# Altium PCB Brake_kit_PCB.PcbDoc
Units mil, origin at the board's own origin, x right, y up, seen from the top; angles counter-clockwise.
Board outline 1574.8 x 2755.91 mil, 2 copper layers (Top Layer, Bottom Layer), stack 57 mil thick; 22 components, 7 nets, 31 pads, 0 vias.
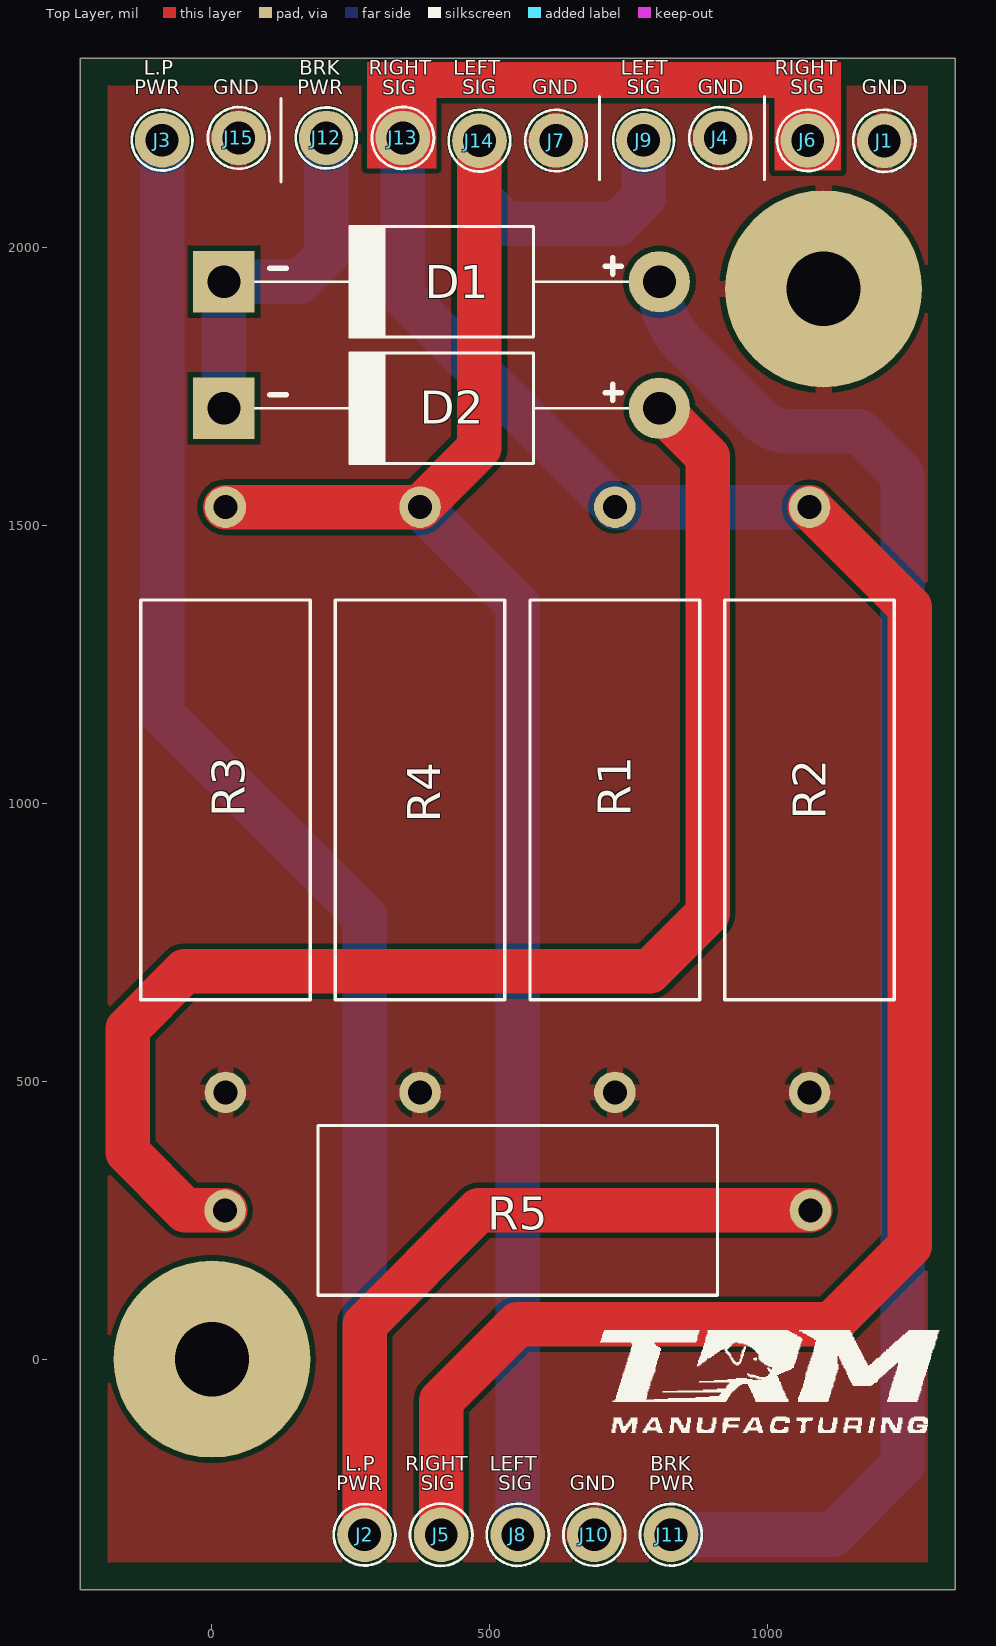
[diagram p0: Top Layer view]
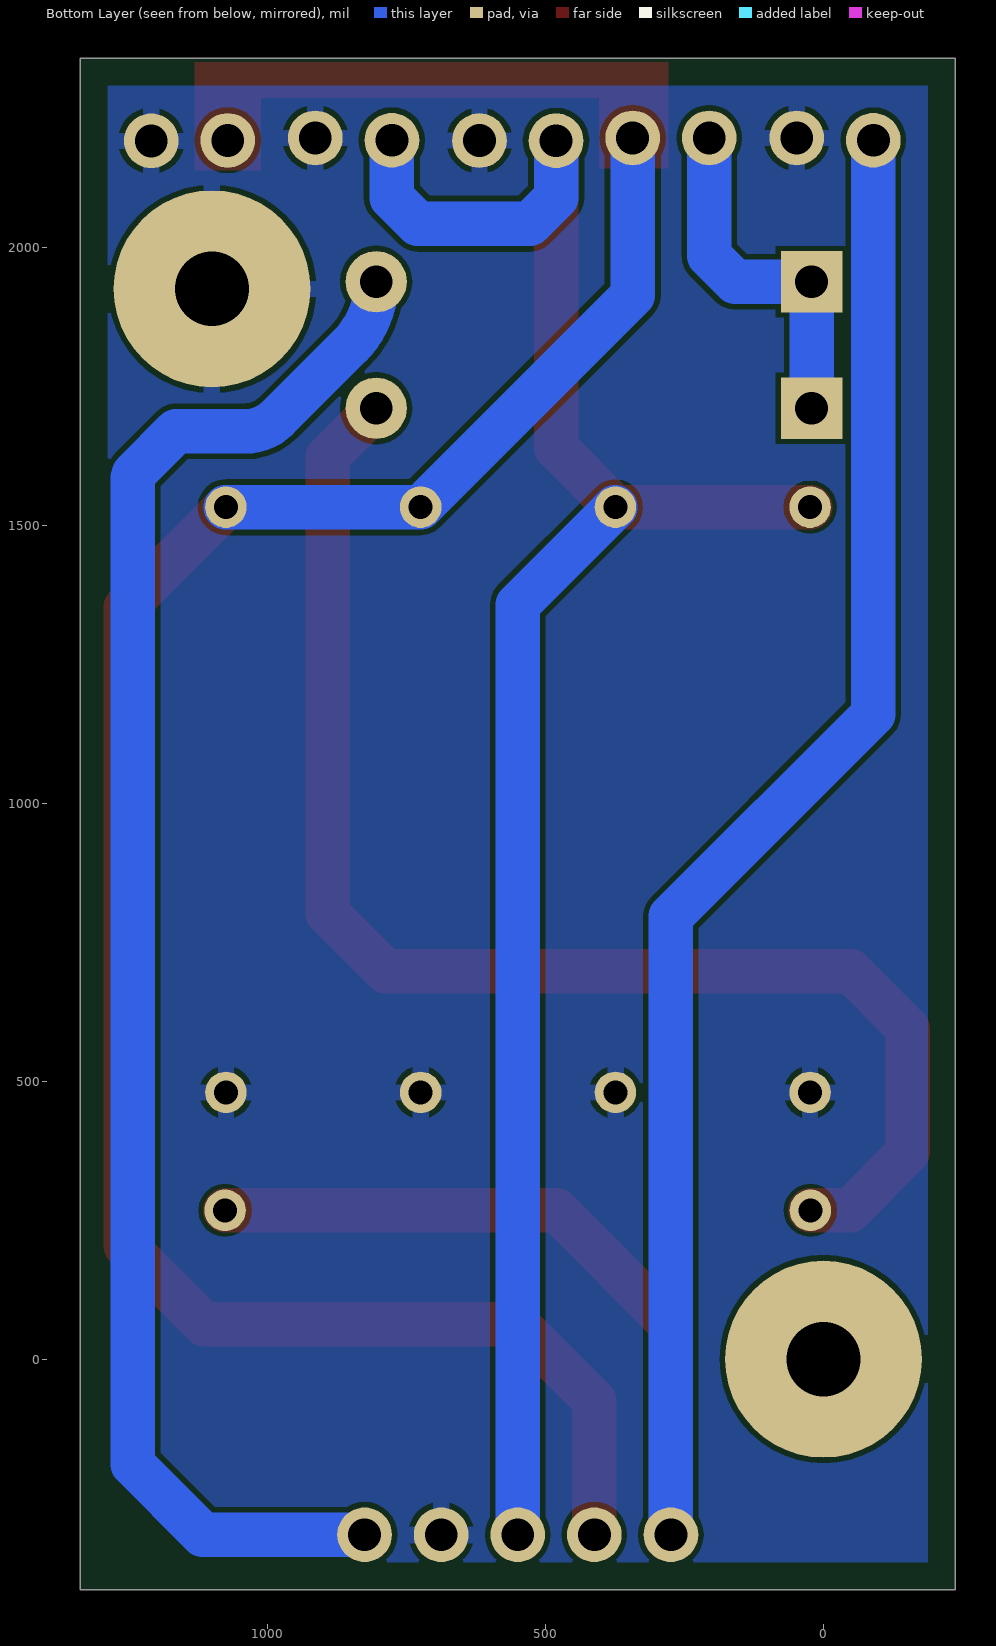
[diagram p1: Bottom Layer view, seen from below]
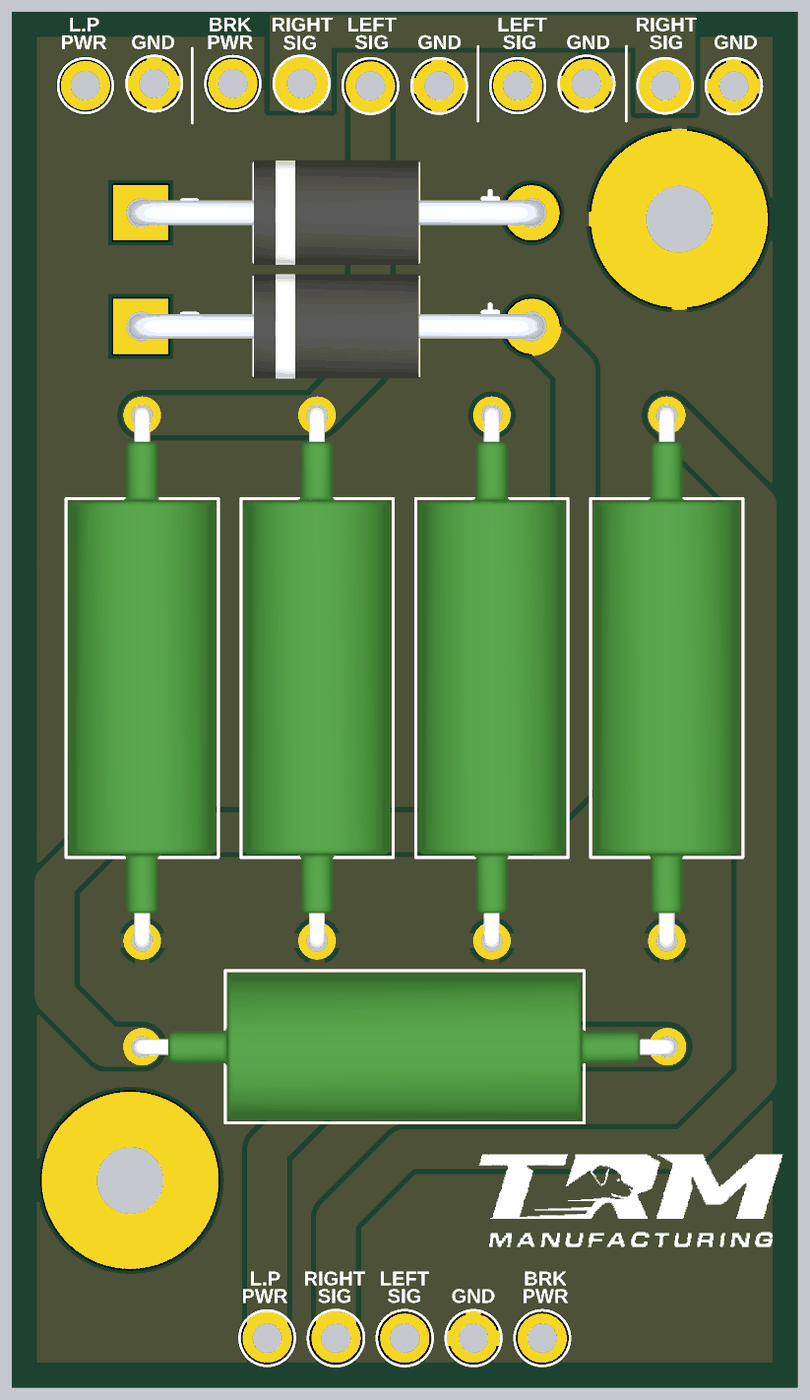
[diagram p2: 3D render of the assembled board from above, using the file's embedded part models]

## Layer stack, top to bottom
Top Solder: solder mask 3, Solder Resist, Dk 3.5
Top Layer: signal copper 10
Dielectric 1: dielectric 37, FR-4, Dk 4.8
Bottom Layer: signal copper 10
Bottom Solder: solder mask 3, Solder Resist, Dk 3.5

## Board outline
-237.25,-415.19 -237.25,2340.71 1337.55,2340.71 1337.55,-415.19

## Design rules (kind name [scope] priority, off if disabled: settings)
Clearance [All] p1: gap=10 ignorepadtopadclearanceinfootprint=FALSE except(0: Arc-Hole Track-Hole SMDPad-Hole THPad-Hole Via-Hole Fill-Hole Poly-Hole Region-Hole Text-Hole; 5: Arc-THPad Track-THPad SMDPad-THPad THPad-THPad)
ComponentClearance [All] p1: gap=0 collisioncheckmode=3 verticalgap=0 showdistances=FALSE
HoleSize [All] p1: absolutevalues=TRUE maxlimit=196.85 minlimit=1 maxpercent=80.000 minpercent=20.000
HoleToHoleClearance [All] p1: gap=0 allowstackedmicrovias=TRUE
MinimumSolderMaskSliver [All] p1: minsoldermaskwidth=0
PolygonConnect [All] p1: connectstyle=Relief reliefconductorwidth=30 reliefentries=4 polygonreliefangle="90 Angle" airgapwidth=10
RoutingVias [All] p1: holewidth=28 width=50 viastyle="Through Hole" minholewidth=28 minwidth=50 maxholewidth=28 maxwidth=50
SilkToSilkClearance [All] p1: silktosilkclearance=0
SilkToSolderMaskClearance [IsPad] p1: minsilkscreentomaskgap=0 clearancetoexposedcopper=TRUE
SolderMaskExpansion [All] p1: expansion=4 istentingtop=FALSE
Width [All] p1: maxlimit=80 minlimit=10 preferedwidth=10
24 further rules are at their usual default settings.

## Components (designator, comment, footprint, x,y, rotation, side; value= is the part's Value field where it differs from the comment)
D1 "1N5822" DO-201AD 413.15,1938.24 r0 top
D2 "1N5822" DO-201AD 413.15,1710.81 r0 top
J1 "GND" "Through Hole Pad (High Power)_" 1209.6,2191.81 r0 top
J2 "LP POWER" "Through Hole Pad (High Power)_" 274.56,-315.98 r0 top
J3 "LICENCE PLATE LIGHT" "Through Hole Pad (High Power)_" -89.62,2193.02 r0 top
J4 "GND" "Through Hole Pad (High Power)_" 914.32,2197.03 r0 top
J5 "RIGHT SIGNAL" "Through Hole Pad (High Power)_" 412.35,-315.98 r0 top
J6 "RIGHT SIGNAL" "Through Hole Pad (High Power)_" 1071.8,2192.6 r0 top
J7 "GND" "Through Hole Pad (High Power)_" 619.05,2192.36 r0 top
J8 "LEFT SIGNAL" "Through Hole Pad (High Power)_" 550.15,-315.98 r0 top
J9 "LEFT SIGNAL" "Through Hole Pad (High Power)_" 776.53,2192.88 r0 top
J10 "GND" "Through Hole Pad (High Power)_" 687.94,-315.98 r0 top
J11 "BRAKE POWER" "Through Hole Pad (High Power)_" 825.74,-315.98 r0 top
J12 "BRAKE POWER" "Through Hole Pad (High Power)_" 205.66,2197.03 r0 top
J13 "RIGHT SIGNAL" "Through Hole Pad (High Power)_" 343.46,2197.03 r0 top
J14 "LEFT SIGNAL" "Through Hole Pad (High Power)_" 481.25,2192.15 r0 top
J15 "GND" "Through Hole Pad (High Power)_" 48.18,2197.03 r0 top
R1 "30R" AC05000003009JAC00 708.82,975.81 r90 top
R2 "30R" AC05000003009JAC00 1059.15,975.81 r90 top
R3 "30R" AC05000003009JAC00 8.15,975.81 r90 top
R4 "30R" AC05000003009JAC00 358.48,975.81 r90 top
R5 "15R" AC05000001509JAC00 550.15,267.72 r180 top

## Footprints (in the part's own frame and the unit in brackets; to place one, negate y for a bottom-side part, rotate by r counter-clockwise, add the part's x,y. Pads: shape width x height; smd on the part's side, far side on the other; paste and mask are expansions set on the pad)
AC05000001509JAC00 [mil]
  round 74.8 hole 43 paste-31.5 mask+0: 1(-526.5,0) 2(526.5,0)
  silkscreen extent -360,-153 360,153, body extent -541,-147 543,148, height 299
AC05000003009JAC00 [mil]
  round 74.8 hole 43 paste-31.5 mask+0: 1(-496,-16) 2(557,-16)
  silkscreen extent -329,-168 390,137, body extent -511,-163 574,132, height 299
DO-201AD [mm]
  rect 2.8x2.8 hole 1.5: 1(-9.95,0)
  round 2.8 hole 1.5: 2(9.95,0)
  silkscreen extent -8.5,-2.52 8.5,2.53, body extent -10.58,-2.65 10.58,2.65, height 5.29
"Through Hole Pad (High Power)_" [mm]
  round 2.5 hole 1.5: 1(0,0)
  silkscreen extent -1.42,-1.42 1.42,1.42

## Part data
D1 D2: "40V 3A 525mV@3A DO-201AD Schottky Barrier Diodes (SBD) ROHS", LCSC Part Number=C3018526, Manufacturer=FUXINSEMI, Package=DO-201AD, ComponentLink1Description=LCSC, ComponentLink1URL=https://www.lcsc.com/product-detail/Schottky-Barrier-Diodes-SBD_FUXINSEMI-1N5822_C3018526.html, Item Type=Diode, Manufacturer Part Number=1N5822
J1 J2 J3 J4 J5 J6 J7 J8 J9 J10 J11 J12 J13 J14 J15: library part Through_Hole_Pad, "Wire Connecting Pad"
R1 R2 R3 R4: library part AC05000003009JAC00, "RES 30 OHM 5W 5% AXIAL", LCSC Part Number=C1364699, Manufacturer=Vishay, Supplier Part Number=594-AC05W30R00J, Category="Through-Hole Resistors", ComponentLink1Description=https://datasheet.ciiva.com/2714/acseries-2714814.pdf?src-supplier=Digi-Key, ComponentLink1URL=https://datasheet.ciiva.com/2714/acseries-2714814.pdf?src-supplier=Digi-Key, ComponentLink2Description=https://datasheet.ciiva.com/2714/acseries-2714815.pdf?src-supplier=Digi-Key, ComponentLink2URL=https://datasheet.ciiva.com/2714/acseries-2714815.pdf?src-supplier=Digi-Key, ComponentLink3Description=https://datasheet.ciiva.com/8329/acseries-8329545.pdf?src-supplier=Avnet, ComponentLink3URL=https://datasheet.ciiva.com/8329/acseries-8329545.pdf?src-supplier=Avnet, ComponentLink4Description=https://datasheet.ciiva.com/7175/1819490-7175151.pdf?src-supplier=Newark, ComponentLink4URL=https://datasheet.ciiva.com/7175/1819490-7175151.pdf?src-supplier=Newark, Item Type=Resistor, Manufacturer Part Number=AC05000003009JAC00, Pricing="1=0.9, 10=0.647, 50=0.647, 100=0.489, 1000=0.326, 10000=0.305 (USD)", RoHS=Yes, Stock=1347, Supplier=Mouser
R5: library part AC05000001509JAC00, "RES 15 OHM 5W 5% AXIAL", LCSC Part Number=C1364893, Manufacturer=Vishay, Supplier Part Number=594-AC05W15R00J, Category="Through-Hole Resistors", ComponentLink1Description=https://datasheet.ciiva.com/2714/acseries-2714740.pdf?src-supplier=Digi-Key, ComponentLink1URL=https://datasheet.ciiva.com/2714/acseries-2714740.pdf?src-supplier=Digi-Key, ComponentLink2Description=https://datasheet.ciiva.com/2714/acseries-2714741.pdf?src-supplier=Digi-Key, ComponentLink2URL=https://datasheet.ciiva.com/2714/acseries-2714741.pdf?src-supplier=Digi-Key, ComponentLink3Description=https://datasheet.ciiva.com/7301/1819490-7301941.pdf?src-supplier=Newark, ComponentLink3URL=https://datasheet.ciiva.com/7301/1819490-7301941.pdf?src-supplier=Newark, ComponentLink4Description=https://datasheet.ciiva.com/1479/acseries-1479826.pdf?src-supplier=Element14, ComponentLink4URL=https://datasheet.ciiva.com/1479/acseries-1479826.pdf?src-supplier=Element14, ComponentLink5Description=https://datasheet.ciiva.com/8321/acseries-8321756.pdf?src-supplier=Avnet, ComponentLink5URL=https://datasheet.ciiva.com/8321/acseries-8321756.pdf?src-supplier=Avnet, Item Type=Resistor, Manufacturer Part Number=AC05000001509JAC00, Pricing="1=0.86, 10=0.647, 50=0.647, 100=0.489, 1000=0.327, 10000=0.305 (USD)", RoHS=Yes, Stock=3720, Supplier=Mouser

## Free pads (board coordinates)
  round 354.33 hole 133.86: MH(0,0) MH(1100.3,1925.52)

## Nets (pads, with @x,y where several pads share a name; then routed paths per layer and width w, separated by ;. In a path a pad name is that pad's centre, name@x,y a point inside that pad or via, vN(x,y) a via of type N, cw(c..) or ccw(c..) an arc to the next point about the centre after c; other vN are vias at no path point)
BRAKEPWR: D1.2 J11.1 | length 2864.1
  Bottom Layer w80: D1.2@804.28,1934.62 D1.2 ccw(c969.33,1938.24) 853.05,1821.95 980.71,1694.29 ccw(c1041.76,1755.34) 1041.76,1669 1165,1669 1236.78,1597.22 cw(c1221.42,1581.85) 1243.15,1581.85 1243.15,-189.33 1116.5,-315.98 J11.1
GND: J1.1 J4.1 J7.1 J10.1 J15.1 pad.MH@1100.3,1925.52 R1.1 R2.1 R3.1 R4.1
LEFTSIG: J8.1 J9.1 J14.1 R3.2 R4.2 | length 3514.9
  Top Layer w80: R3.2 R4.2 481.25,1639.58 J14.1
  Bottom Layer w80: R4.2 550.15,1357.14 J8.1 ; J14.1 481.25,2089.86 528.11,2043 729.66,2043 776.53,2089.86 J9.1
LPPWR: J2.1 J3.1 R5.1 | length 3925.3
  Top Layer w80: J2.1 274.56,62.22 480.06,267.72 R5.1
  Bottom Layer w80: J3.1 -89.62,1160.57 274.56,796.4 J2.1
NetD1_1: D1.1 D2.1 J12.1 | length 643
  Bottom Layer w80: D2.1 D1.1 158.8,1938.24 205.66,1985.1 J12.1
NetD2_2: D2.2 R5.2 | length 2516.2
  Top Layer w80: R5.2 -47.72,267.72 -151.85,371.85 -151.85,594.71 -48.76,697.81 787.81,697.81 892.15,802.15 892.15,1623.54 D2.2
RIGHTSIG: J5.1 J6.1 J13.1 R1.2 R2.2 | length 3775.3
  Top Layer w80: J5.1 412.35,-75.08 550.24,62.81 1114.24,62.81 1255.15,203.71 1255.15,1352.81 R2.2
  Bottom Layer w80: J13.1 343.46,1914.17 R1.2 R2.2

## Polygon pours and split planes (outlines as drawn)
GND on Bottom Layer "Bottom Layer-GND" (solid, remove dead copper, pour order 3): -187.25,-365.19 -187.25,2290.71 1287.55,2290.71 1287.55,-365.19
GND on Top Layer "Top Layer-GND" (solid, remove dead copper, pour order 1): -187.25,-365.19 -187.25,2290.71 1287.55,2290.71 1287.55,-365.19

## Other copper
Top Layer:
  rectangle net RIGHTSIG: 288.31,2269 1132,2333.43
  rectangle net RIGHTSIG: 279,2142.51 403.65,2333.43
  rectangle net RIGHTSIG: 1012,2138.08 1132,2329

## Silkscreen, mask and mechanical layers (free items; w line width, h text height)
Top Overlay:
  drawing of 19 lines, arcs and shapes, not listed
  text "L.P" at -122.98,2301.81 h45
  text "BRK" at 157.07,2301.81 h45
  text "RIGHT" at 282.46,2301.79 h45
  text "LEFT" at 434.4,2301.81 h45
  text "LEFT" at 735.81,2301.81 h45
  text "RIGHT" at 1012.25,2301.79 h45
  text "PWR" at -139.47,2266.35 h45
  text "GND" at 1.93,2266.33 h45
  text "PWR" at 153.8,2266.35 h45
  text "SIG" at 449.99,2266.33 h45
  text "GND" at 575.8,2266.33 h45
  text "SIG" at 746.27,2266.33 h45
  text "GND" at 873.79,2266.33 h45
  text "SIG" at 1040.19,2266.33 h45
  text "GND" at 1169.07,2266.33 h45
  text "SIG" at 306.19,2265.33 h45
  text "L.P" at 239.69,-210.19 h45
  text "RIGHT" at 347.66,-210.21 h45
  text "LEFT" at 499.81,-210.19 h45
  text "BRK" at 788.66,-210.19 h45
  text "PWR" at 223.21,-245.19 h45
  text "SIG" at 375.6,-245.21 h45
  text "SIG" at 515.4,-245.21 h45
  text "GND" at 643.41,-245.21 h45
  text "PWR" at 785.39,-245.19 h45
Dimensions:
  lines w10: -237.25,962.76 1337.55,962.76 ; 550.15,-415.19 550.15,962.76 ; 550.15,2340.71 550.15,962.76 ; -237.25,-415.19 1337.55,-415.19 ; -237.25,-415.19 -237.25,2340.71 ; -237.25,-415.19 550.15,962.76 ; -237.25,2340.71 1337.55,2340.71 ; -237.25,2340.71 550.15,962.76 ; 550.15,962.76 1337.55,2340.71 ; 550.15,962.76 1337.55,-415.19 ; 1337.55,-415.19 1337.55,2340.71
Board Outline:
  the board outline again, w10
Fabrication:
  drawing of 191 lines, arcs and shapes, not listed
  text "Layer" at 1623.5,2376 h60
  text "Name" at 2033.41,2376 h60
  text "Material" at 2963.16,2376 h60
  text "Thickness" at 3822.92,2376 h60
  text "Constant" at 4472.76,2376 h60
  text "Board Layer Stack" at 5042.62,2376 h60
  text "Top Overlay" at 2033.41,2256 h60
  text "Top Solder" at 2033.41,2136 h60
  text "Solder Resist" at 2963.16,2136 h60
  text "3.00mil" at 3822.92,2136 h60
  text "3.5" at 4472.76,2136 h60
  text "1" at 1623.5,2016 h60
  text "Top Layer" at 2033.41,2016 h60
  text "10.00mil" at 3822.92,2016 h60
  text "Dielectric 1" at 2033.41,1896 h60
  text "FR-4" at 2963.16,1896 h60
  text "37.00mil" at 3822.92,1896 h60
  text "4.8" at 4472.76,1896 h60
  text "2" at 1623.5,1776 h60
  text "Bottom Layer" at 2033.41,1776 h60
  text "10.00mil" at 3822.92,1776 h60
  text "Bottom Solder" at 2033.41,1656 h60
  text "Solder Resist" at 2963.16,1656 h60
  text "3.00mil" at 3822.92,1656 h60
  text "3.5" at 4472.76,1656 h60
  text "Bottom Overlay" at 2033.41,1536 h60
  text "Total board thickness:" at 1623.5,1416 h60
  text "63.00mil" at 3822.92,1416 h60
Drill Drawing:
  circle w10: c-183.38,3169.83 r33.33
  lines w10: -216.71,2903.17 -150.04,2903.17 -183.38,2836.5 -216.71,2903.17 ; -216.71,2986.5 -150.04,2986.5 -150.04,3053.17 -216.71,3053.17 -216.71,2986.5
  lines w15: -276.5,2791.5 7073.49,2791.5 ; -276.5,3241.5 7073.49,3241.5 ; 274.38,2641.5 274.38,3391.5 ; 804.24,2641.5 804.24,3391.5 ; 1953.9,2641.5 1953.9,3391.5 ; 2459.78,2641.5 2459.78,3391.5 ; 3193.58,2641.5 3193.58,3391.5 ; 4693.13,2641.5 4693.13,3391.5 ; 5282.98,2641.5 5282.98,3391.5 ; 6028.78,2641.5 6028.78,3391.5 ; -276.5,2641.5 7073.49,2641.5 7073.49,3391.5 -276.5,3391.5 -276.5,2641.5
  text "Symbol" at -186.5,3286.5 h72
  text "Count" at 319.38,3286.5 h72
  text "Hole Size" at 849.24,3286.5 h72
  text "Plated" at 1998.9,3286.5 h72
  text "Hole Type" at 2504.78,3286.5 h72
  text "Drill Layer Pair" at 3238.58,3286.5 h72
  text "Via/Pad" at 4738.13,3286.5 h72
  text "Pad Shape" at 5327.98,3286.5 h72
  text "Template" at 6073.78,3286.5 h72
  text "10" at 319.38,3136.5 h60
  text "43.00mil (1.092mm)" at 849.24,3136.5 h60
  text "PTH" at 1998.9,3136.5 h60
  text "Round" at 2504.78,3136.5 h60
  text "Top Layer - Bottom Layer" at 3238.58,3136.5 h60
  text "Pad" at 4738.13,3136.5 h60
  text "Rounded" at 5327.98,3136.5 h60
  text "c190h109m190p110" at 6073.78,3136.5 h60
  text "19" at 319.38,2986.5 h60
  text "59.06mil (1.500mm)" at 849.24,2986.5 h60
  text "PTH" at 1998.9,2986.5 h60
  text "Round" at 2504.78,2986.5 h60
  text "Top Layer - Bottom Layer" at 3238.58,2986.5 h60
  text "Pad" at 4738.13,2986.5 h60
  text "(Mixed)" at 5327.98,2986.5 h60
  text "(Mixed)" at 6073.78,2986.5 h60
  text "2" at 319.38,2836.5 h60
  text "133.86mil (3.400mm)" at 849.24,2836.5 h60
  text "PTH" at 1998.9,2836.5 h60
  text "Round" at 2504.78,2836.5 h60
  text "Top Layer - Bottom Layer" at 3238.58,2836.5 h60
  text "Pad" at 4738.13,2836.5 h60
  text "Rounded" at 5327.98,2836.5 h60
  text "c900h340" at 6073.78,2836.5 h60
  text "31 Total" at 319.38,2686.5 h60

## Dimensions
-237.25,2340.71 to -237.25,-415.19 on Dimensions
1337.55,2340.71 to -237.25,2340.71 on Dimensions